# Altium PCB A313.2.PcbDoc (part 3 of 3)
Units mm, origin at the board's own origin, x right, y up, seen from the top; angles counter-clockwise.
Board outline 230.01 x 157.01 mm, 2 copper layers (Top Layer, Bottom Layer); 268 components, 266 nets, 1114 pads, 1214 vias.
Unrouted connection lines stored in the file: 2.
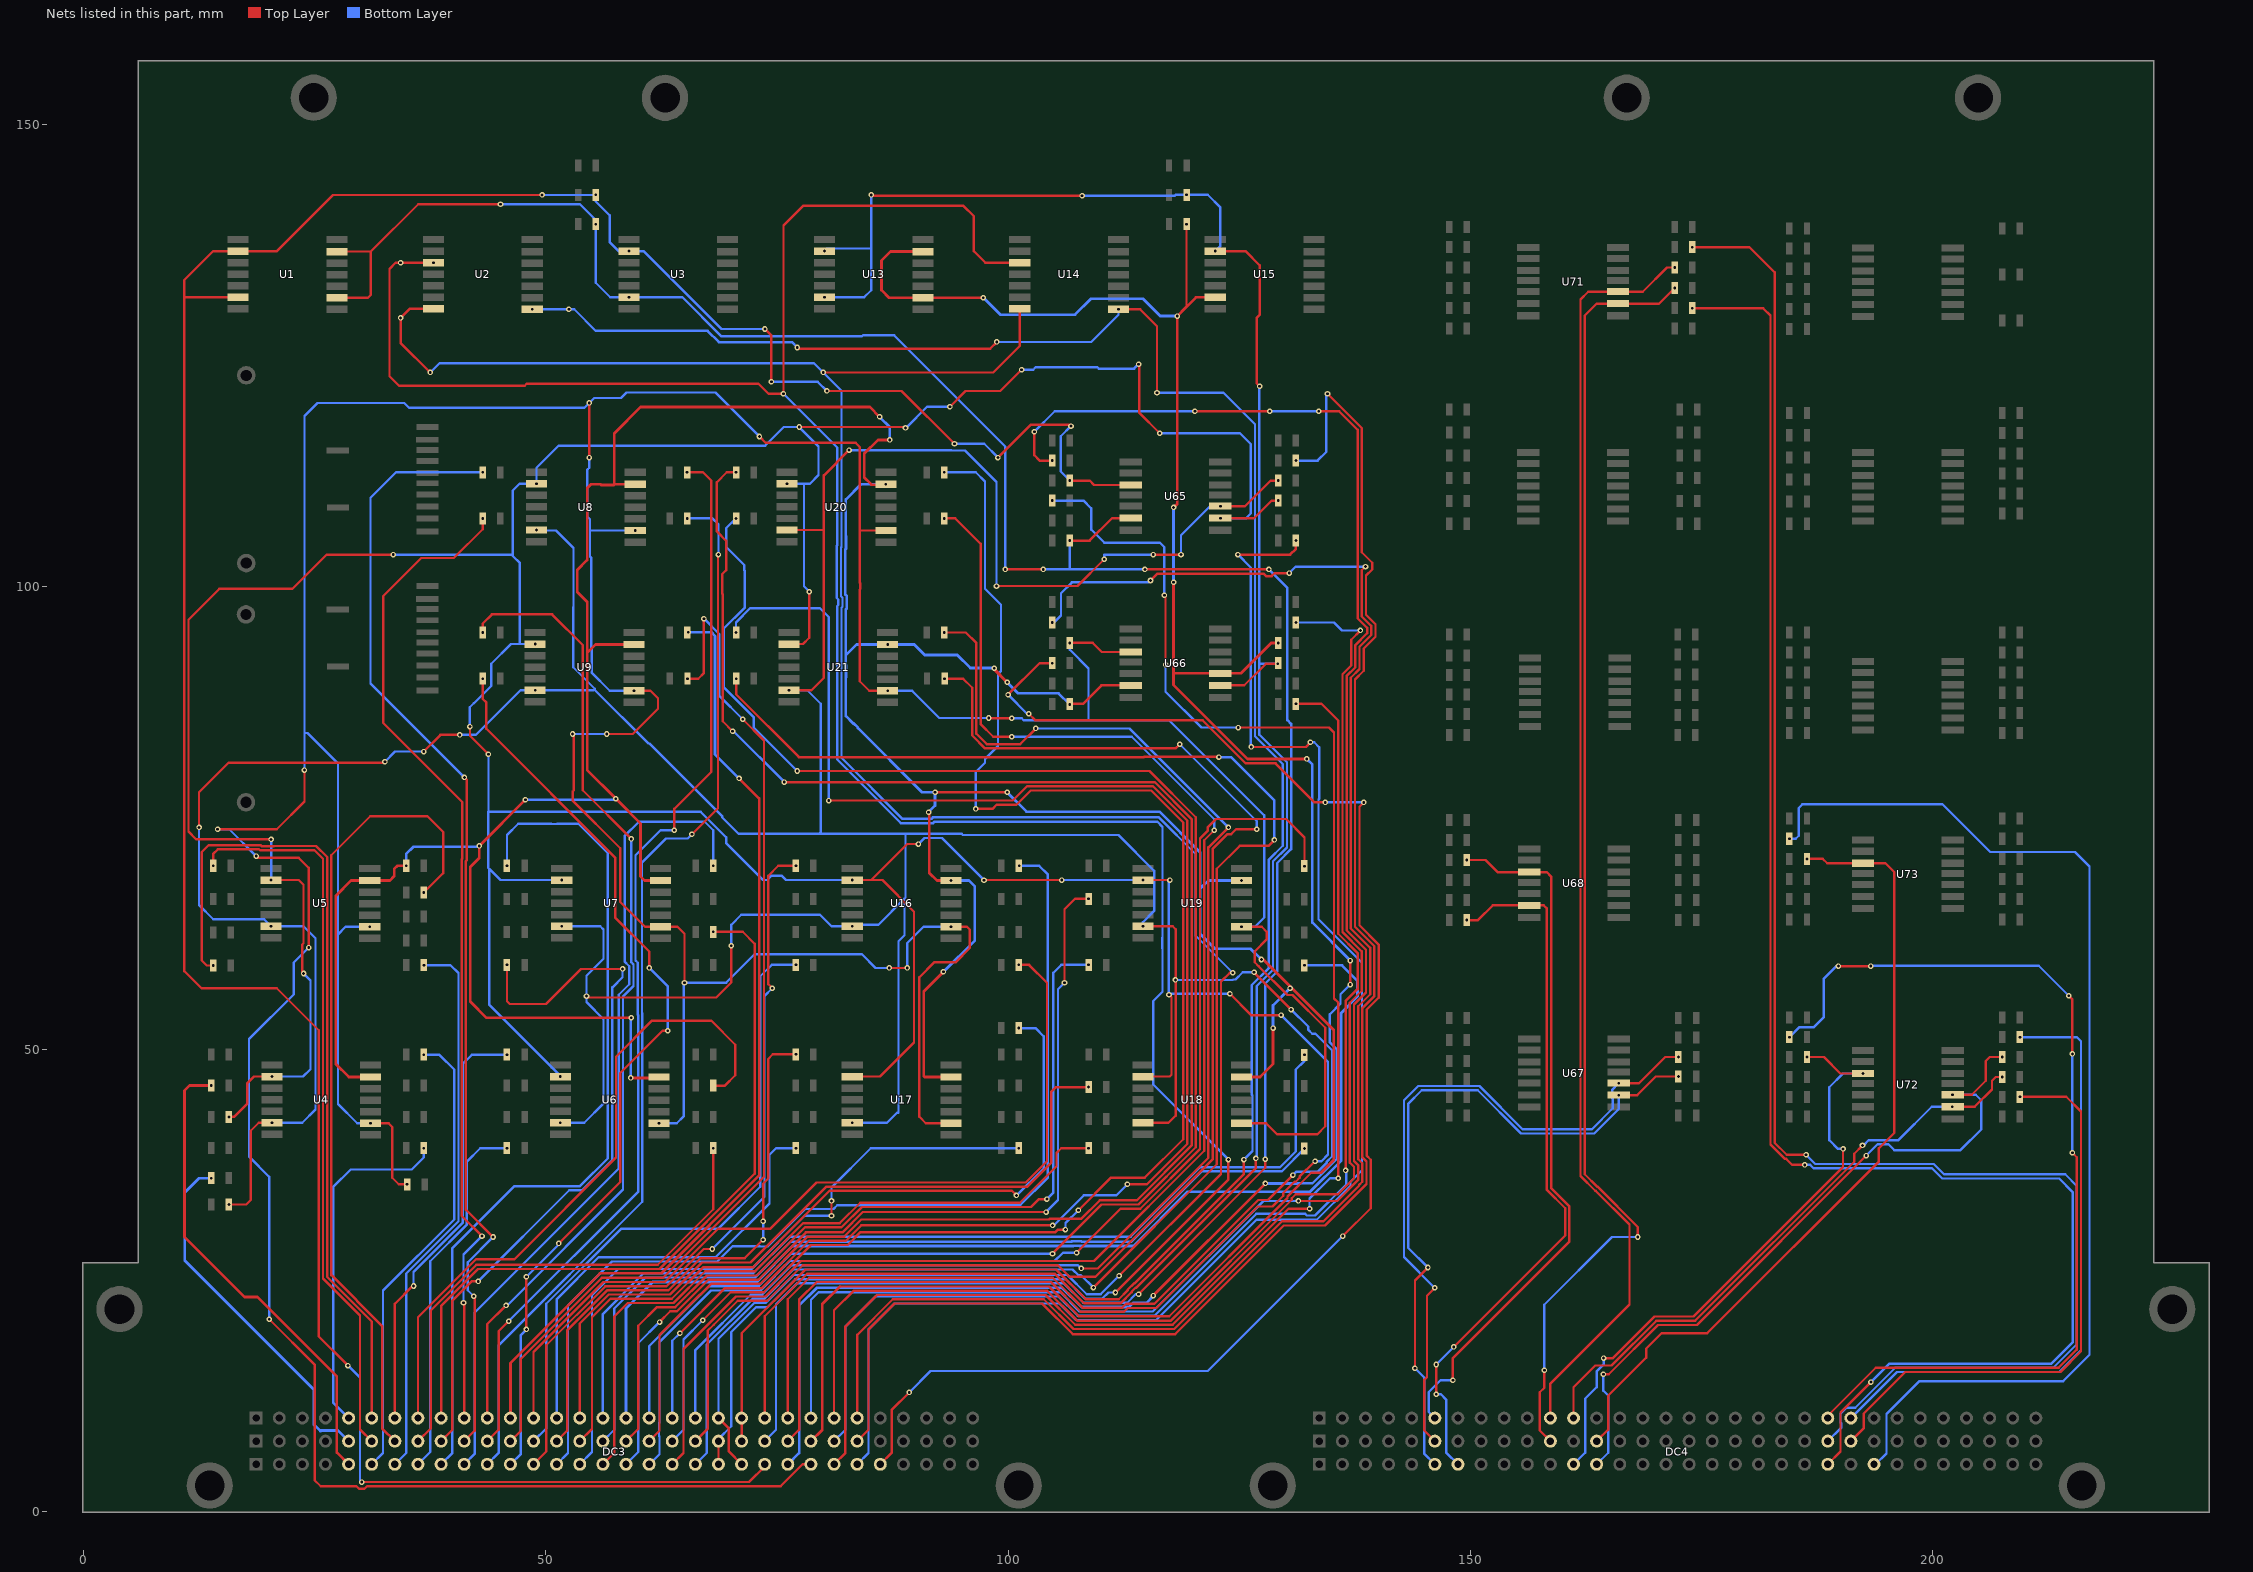
[diagram p3: the nets of this part, all layers, seen from the top]

## Via types
v1: diameter 0.6, hole 0.3, Top Layer to Bottom Layer, 1214 vias

## Nets (pads, with @x,y where several pads share a name; then routed paths per layer and width w, separated by ;. In a path a pad name is that pad's centre, name@x,y a point inside that pad or via, vN(x,y) a via of type N, cw(c..) or ccw(c..) an arc to the next point about the centre after c; other vN are vias at no path point) (continued)
"UPR D": DC4.B11 R169.2 U71.9 | length 141.6
  Top Layer w0.254: v1(158,15.3) 158,13.401 157.5,12.901 157.5,8.771 DC4.B11@158.65,7.621 ; v1(168.1,29.7) 168.1,30.78 163.729,35.151 163.691,35.151 162.354,36.488 162.354,129.354 163.634,130.634 U71.9@165.95,130.634 170.385,130.634 v1(172.099,132.347)
  Bottom Layer w0.254: v1(158,15.3) 157.973,15.327 157.973,22.373 165.3,29.7 v1(168.1,29.7)
"UPR D TTL": DC4.A23 R173.1 | length 183.9
  Top Layer w0.254: v1(173.999,130.15) 181.65,130.15 182.446,129.354 182.446,39.712 184.012,38.146 184.154,38.146 184.8,37.5 v1(186.15,37.5) ; DC4.A23@188.65,5.121 190.023,6.494 190.023,10.723 v1(193.308,14.008)
  Bottom Layer w0.254: v1(186.15,37.5) 186.758,37.5 187.112,37.146 199.912,37.146 201.034,36.024 213.676,36.024 215.129,34.571 215.129,18.288 212.849,16.008 195.308,16.008 v1(193.308,14.008)
"UPR F": DC4.A12 R179.2 U72.3 | length 67.9
  Top Layer w0.254: v1(164.4,16.6) 165.423,16.6 169.92,21.097 174.113,21.097 190.3,37.284 v1(190.3,39.227) ; v1(186.399,49.16) 188.228,49.16 190.003,47.385 v1(192.448,47.385)
  Bottom Layer w0.254: DC4.A12@161.15,5.121 162.4,6.371 162.4,12.201 163.65,13.451 163.65,15.162 164.4,15.912 v1(164.4,16.6) ; v1(190.3,39.227) 189.754,39.227 188.8,40.181 188.8,45.9 190.285,47.385 v1(192.448,47.385)
"UPR F TTL": DC4.C23 R183.1 | length 106
  Top Layer w0.254: DC4.C23@188.65,10.121 188.65,10.378 193.826,15.554 213.615,15.554 215.583,17.522 215.583,38.317 v1(215.1,38.8) ; v1(189.8,59) v1(193.3,59) ; v1(214.7,55.8) 215.1,55.4 v1(215.1,49.5)
  Bottom Layer w0.254: v1(184.499,51.308) 185.591,52.4 187.15,52.4 188.2,53.45 188.2,57.6 189.6,59 v1(189.8,59) ; v1(193.3,59) 193.346,59.046 211.454,59.046 v1(214.7,55.8) ; v1(215.1,38.8) v1(215.1,49.5)
"UPR KN1": DC4.A13 R182.2 U72.10 | length 77.6
  Top Layer w0.254: v1(164.377,14.861) 164.968,14.861 170.296,20.189 174.489,20.189 v1(192.8,38.5) ; v1(202.148,45.085) 204.223,45.085 205.738,46.6 205.738,48.738 206.16,49.16 v1(207.524,49.16)
  Bottom Layer w0.254: DC4.A13@163.65,5.121 164.9,6.371 164.9,12.542 164.377,13.065 v1(164.377,14.861) ; v1(192.8,38.5) 194.027,39.727 195.201,39.727 195.828,39.1 203,39.1 205.242,41.342 205.242,44.5 204.657,45.085 v1(202.148,45.085)
"UPR KN1 TTL": DC4.C24 R186.1 | length 68.1
  Bottom Layer w0.254: DC4.C24@191.15,10.121 196.129,15.1 213.681,15.1 216.037,17.456 216.037,50.863 215.592,51.308 v1(209.424,51.308)
"UPR KN2": DC4.C12 R181.2 U72.9 | length 64.7
  Top Layer w0.254: DC4.C12@161.15,10.121 161.15,13.45 163.5,15.8 165.265,15.8 170.108,20.643 174.301,20.643 191.5,37.842 191.5,38.7 v1(192.4,39.6) ; v1(202.1,43.786) U72.9@202.148,43.786 204.528,43.786 206.4,45.658 206.4,46.6 206.812,47.012 v1(207.524,47.012)
  Bottom Layer w0.254: v1(192.4,39.6) 192.5,39.6 193.081,40.181 196.281,40.181 199.886,43.786 v1(202.1,43.786)
"UPR KN2 TTL": DC4.B24 R185.1 | length 63
  Top Layer w0.254: DC4.B24@191.15,7.621 192.523,8.994 192.523,10.588 197.035,15.1 213.803,15.1 216.037,17.334 216.037,43.263 214.435,44.865 v1(209.424,44.865)
"UPR PP": DC4.C11 R170.2 U71.10 | length 138.4
  Top Layer w0.254: DC4.C11@158.65,10.121 158.65,13.85 167.2,22.4 167.2,31.038 163.541,34.697 163.503,34.697 161.9,36.3 161.9,131.1 162.733,131.933 U71.10@165.95,131.933 168.633,131.933 171.245,134.545 v1(172.099,134.545)
"UPR PP TTL": DC4.B23 R174.1 | length 188.2
  Top Layer w0.254: v1(173.999,136.743) 180.185,136.743 182.9,134.028 182.9,39.9 184.2,38.6 v1(186.3,38.6)
  Bottom Layer w0.254: v1(186.3,38.6) 187.3,37.6 200.1,37.6 201.222,36.478 214.322,36.478 215.583,35.217 215.583,18.1 213.037,15.554 195.941,15.554 191.626,11.239 191.617,11.248 190.683,11.248 190.023,10.588 190.023,9.654 190.089,9.589 190.089,9.06 DC4.B23@188.65,7.621
"UPR T1 TTL": DC3.C25 R95.1 | length 204.6
  Top Layer w0.254: v1(102.84,116.8) 102.84,114.24 103.411,113.669 v1(104.776,113.669) ; v1(120.2,119) v1(128.3,119) ; v1(131.4,33.6) 135.597,33.6 137.854,35.857 137.854,37.488 137.408,37.934 137.408,54.836 138.708,56.136 138.708,60.776 136.61,62.874 136.61,90.368 137.554,91.312 137.554,93.726 138.827,94.999 138.827,95.601 137.8,96.628 137.8,117 135.8,119 v1(133.6,119)
  Bottom Layer w0.254: DC3.C25@78.675,10.121 78.675,22.904 79.498,23.726 105.641,23.726 107.729,21.638 115.642,21.638 127.604,33.6 v1(131.4,33.6) ; v1(102.84,116.8) 105.04,119 v1(120.2,119) ; v1(128.3,119) v1(133.6,119)
"UPR T2 TTL": DC3.A26 R98.1 | length 178.3
  Top Layer w0.254: DC3.A26@81.175,5.121 82.4,6.346 82.4,20.017 85.805,23.422 104.047,23.422 107.266,20.203 117.788,20.203 130.338,32.753 v1(132.6,32.753) ; v1(116.9,99.1) 117.028,98.972 v1(117.028,91.6) ; v1(124.9,84.8) 134.7,84.8 135.248,84.252 135.248,55.507 135.7,55.055 v1(135.7,36.057)
  Bottom Layer w0.254: v1(104.776,109.344) 108.156,109.344 109,108.5 109,106.2 110.4,104.8 116.4,104.8 116.9,104.3 v1(116.9,99.1) ; v1(117.028,91.6) 117.028,88.672 120.9,84.8 v1(124.9,84.8) ; v1(132.6,32.753) 132.6,33.85 134.807,36.057 v1(135.7,36.057)
"UPR T3 TTL": DC3.B26 R113.1 | length 132.2
  Top Layer w0.254: v1(131.124,87.361) 133.893,87.361 135.702,85.552 135.702,62.498 137.8,60.4 137.8,56.512 136.5,55.212 v1(136.5,36.9)
  Bottom Layer w0.254: DC3.B26@81.175,7.621 82.4,8.846 82.4,20.017 85.655,23.272 105.453,23.272 107.541,21.184 115.83,21.184 126.846,32.2 132.125,32.2 132.299,32.026 133.2,32.026 136.574,35.4 136.574,36.826 v1(136.5,36.9)
"UPR T4 TTL": DC3.C26 R116.1 | length 145.5
  Top Layer w0.254: DC3.C26@81.175,10.121 81.175,21.775 83.276,23.876 104.235,23.876 107.454,20.657 117.6,20.657 130.673,33.73 130.673,33.901 131.099,34.327 135.682,34.327 137.4,36.045 137.4,37.3 136.954,37.746 136.954,55.024 138.254,56.324 138.254,60.588 136.156,62.686 136.156,90.556 137.1,91.5 137.1,94.3 v1(138.1,95.3)
  Bottom Layer w0.254: v1(131.124,96.152) 135.248,96.152 136.1,95.3 v1(138.1,95.3)
"UPR TE1 TTL": DC3.A27 R101.1 | length 161.7
  Top Layer w0.254: v1(124.85,103.5) 130.5,103.5 131.124,104.124 v1(131.124,105.018) ; v1(126.3,82.7) 132.2,82.7 v1(132.7,83.2)
  Bottom Layer w0.254: DC3.A27@83.675,5.121 84.9,6.346 84.9,19.696 87.718,22.514 105.569,22.514 107.353,20.73 116.018,20.73 126.86,31.572 133.388,31.572 137.028,35.212 137.028,35.673 138.277,36.922 138.277,59.351 137.514,60.114 133.573,64.055 133.573,77.001 133.65,77.078 133.65,82.65 133.1,83.2 v1(132.7,83.2) ; v1(124.85,103.5) 126.246,102.104 126.246,82.754 v1(126.3,82.7)
"UPR TE2 TTL": DC3.B27 R104.1 | length 176.4
  Top Layer w0.254: DC3.B27@83.675,7.621 84.9,8.846 84.9,19.696 87.718,22.514 103.671,22.514 106.985,19.2 118.069,19.2 129.814,30.945 134.287,30.945 138.762,35.42 138.762,37.864 138.316,38.31 138.316,54.46 139.616,55.76 139.616,61.152 137.518,63.25 137.518,89.992 138.462,90.936 138.462,93.35 139.735,94.623 139.735,95.977 138.708,97.004 138.708,101.23 139.377,101.899 139.377,102.623 138.254,103.746 138.254,117.188 v1(134.542,120.9)
  Bottom Layer w0.254: v1(131.124,113.669) 133.469,113.669 134.4,114.6 134.4,120.758 v1(134.542,120.9)
"UPR TE3 TTL": DC3.C27 R107.1 | length 180.8
  Top Layer w0.254: DC3.C27@83.675,10.121 83.675,19.113 87.53,22.968 103.859,22.968 107.078,19.749 117.976,19.749 129.626,31.399 134.099,31.399 137.95,35.25 137.95,35.311 138.308,35.669 138.308,37.676 137.862,38.122 137.862,54.648 139.162,55.948 139.162,60.964 137.064,63.062 137.064,90.18 138.008,91.124 138.008,93.538 139.281,94.811 139.281,95.789 138.254,96.816 138.254,101.804 v1(138.65,102.2) ; v1(115.4,100.7) 116.146,101.446 127.626,101.446 127.899,101.173 128.501,101.173 128.828,101.5 v1(130.4,101.5)
  Bottom Layer w0.254: v1(104.776,96.152) 104.976,96.152 105.726,96.902 105.726,99.326 106.9,100.5 115.2,100.5 v1(115.4,100.7) ; v1(130.4,101.5) 131.1,102.2 v1(138.65,102.2)
"UPR TE4 TTL": DC3.A28 R110.1 | length 162.4
  Top Layer w0.254: DC3.A28@86.175,5.121 87.4,6.346 87.4,10.996 v1(89.3,12.896) ; v1(100,88.356) 103.401,91.757 v1(104.776,91.757) ; v1(102.239,86.3) 102.966,85.573 121.046,85.573 125.696,80.923 128.928,80.923 133.151,76.7 v1(134.3,76.7) ; v1(136.2,29.8) 139.216,32.816 139.216,38.052 138.77,38.498 138.77,54.272 140.07,55.572 140.07,61.34 138,63.41 138,76.238 v1(138.462,76.7)
  Bottom Layer w0.254: v1(89.3,12.896) 91.604,15.2 121.6,15.2 v1(136.2,29.8) ; v1(100,88.356) 102.056,86.3 v1(102.239,86.3) ; v1(134.3,76.7) v1(138.462,76.7) v1@138.5,76.7
"UPR VIH": DC4.B13 R191.2 U73.3 | length 87.8
  Top Layer w0.254: DC4.B13@163.65,7.621 164.9,8.871 164.9,12.542 169,16.642 169,17.609 170.672,19.281 175.597,19.281 194.173,37.857 194.173,39.301 195.83,40.958 195.83,69.169 194.88,70.119 U73.3@192.448,70.119 188.581,70.119 188.107,70.593 v1(186.399,70.593)
"UPR VIH TTL": DC4.A25 R195.1 | length 122.1
  Bottom Layer w0.254: v1(184.499,72.771) 185.171,72.771 185.5,73.1 185.5,76.1 185.9,76.5 201.058,76.5 206.212,71.346 215.382,71.346 216.945,69.783 216.945,16.958 214.103,14.116 198.551,14.116 195,10.565 195,6.3 193.821,5.121 DC4.A25@193.65,5.121
"UPR. C1": DC4.A6 R127.2 U67.9 | length 76.5
  Top Layer w0.254: v1(144,15.5) 144,25 v1(145.4,26.4) ; v1(166.05,45.037) 168.028,45.037 170.048,47.056 v1(172.499,47.056)
  Bottom Layer w0.254: v1(144,15.5) 145.023,14.477 145.023,6.248 DC4.A6@146.15,5.121 ; v1(145.4,26.4) 143.262,28.538 143.262,44.1 144.734,45.572 150.786,45.572 155.458,40.9 163.4,40.9 166.05,43.55 v1(166.05,45.037)
"UPR. C2": DC4.B6 R130.2 U67.10 | length 76
  Top Layer w0.254: DC4.B6@146.15,7.621 145,8.771 145,14.25 145.3,14.55 145.3,23.35 v1(146.15,24.2) ; v1(166.05,46.336) 168.236,46.336 171.069,49.169 v1(172.499,49.169)
  Bottom Layer w0.254: v1(146.15,24.2) 142.808,27.542 142.808,44.482 144.352,46.026 150.974,46.026 155.646,41.354 163.131,41.354 165.4,43.623 165.4,44.659 165.323,44.736 165.323,45.609 v1(166.05,46.336)
"UPR. C3": DC4.C6 R131.2 U68.3 | length 76.6
  Top Layer w0.254: v1(148.1,14.2) 148.1,16.6 160.7,29.2 160.7,33.006 158.722,34.984 158.722,68.694 158.255,69.16 U68.3@156.35,69.16 152.94,69.16 151.626,70.474 v1(149.599,70.474)
  Bottom Layer w0.254: DC4.C6@146.15,10.121 145.5,10.771 145.5,12.928 146.772,14.2 v1(148.1,14.2)
"UPR. C4": DC4.A7 R132.2 U68.6 | length 77.4
  Top Layer w0.254: v1(146.3,12.7) v1(146.3,15.912) ; v1(148.2,17.812) 160.246,29.858 160.246,32.818 158.268,34.796 158.268,65.232 157.939,65.561 U68.6@156.35,65.561 152.412,65.561 150.822,63.971 v1(149.599,63.971)
  Bottom Layer w0.254: v1(146.3,12.7) 146.8,12.7 147.373,12.127 147.373,6.398 DC4.A7@148.65,5.121 ; v1(146.3,15.912) v1(148.2,17.812)
"UPR. T1": DC3.A23 R2.1 R97.2 U1.2 U1.6 U3.2 U65.3 | length 324.6
  Top Layer w0.254: U1.6@16.725,131.326 10.928,131.326 10.902,131.3 ; v1(28.6,15.8) 25.446,18.954 25.446,52.054 20.9,56.6 12.759,56.6 10.902,58.457 10.902,131.3 ; v1(30.1,3.2) 71.979,3.2 73.675,4.896 DC3.A23@73.675,5.121 ; v1(49.6,142.4) 27,142.4 20.926,136.326 U1.2@16.725,136.326 14.044,136.326 10.902,133.184 10.902,131.3 ; v1(73.7,127.9) 74.4,127.2 v1(74.4,122.2) ; v1(80.4,121.2) 88.482,121.2 v1(94.2,115.482) ; v1(98.9,114) 102.427,117.527 106.673,117.527 v1(106.8,117.4) ; v1(106.676,111.506) 108.83,111.506 109.301,111.036 U65.3@113.258,111.036
  Bottom Layer w0.254: v1(28.6,15.8) 29.9,14.5 29.9,3.4 v1(30.1,3.2) ; v1(49.6,142.4) 55.384,142.4 v1(55.4,142.416) 55.4,141.7 56.9,140.2 56.9,137.3 57.874,136.326 v1(58.995,136.326) 60.574,136.326 69,127.9 v1(73.7,127.9) ; v1(74.4,122.2) 79.4,122.2 v1(80.4,121.2) ; v1(94.2,115.482) 97.418,115.482 v1(98.9,114) ; v1(106.676,111.506) 105.7,112.482 105.7,116.3 v1(106.8,117.4)
"UPR. T2": DC3.B23 R3.1 R100.2 U1.9 U1.13 U3.6 U65.6 | length 293.3
  Top Layer w0.254: U1.9@27.4,131.276 30.776,131.276 31.076,131.576 31.076,136.276 ; U1.13@27.4,136.276 31.076,136.276 ; v1(45.1,141.4) 36.2,141.4 31.076,136.276 ; v1(99.7,101.9) v1(103.8,101.9) ; v1(106.676,105.018) 108.818,105.018 111.236,107.436 U65.6@113.258,107.436 ; v1(114.107,23.5) 127.8,37.193 v1(127.8,38.1) ; v1(114.8,101.9) v1(128.2,101.9)
  Bottom Layer w0.254: v1(45.1,141.4) 53.7,141.4 55.4,139.7 v1(55.4,139.232) 55.4,132.9 56.974,131.326 v1(58.995,131.326) 64.774,131.326 69,127.1 84.172,127.1 84.299,127.227 87.673,127.227 99.7,115.2 v1(99.7,101.9) ; DC3.B23@73.675,7.621 74.9,8.846 74.9,22.4 77.18,24.68 106.036,24.68 108.124,22.592 112.876,22.592 113.784,23.5 v1(114.107,23.5) ; v1(103.8,101.9) 106.7,101.9 ; v1(106.676,105.018) 106.676,101.924 106.7,101.9 ; v1(114.8,101.9) 106.7,101.9 ; v1(127.8,38.1) 127.8,57.116 129.108,58.424 129.108,70.148 130.608,71.648 130.608,85.192 130.2,85.6 130.2,99.9 v1(128.2,101.9)
"UPR. T3": DC3.C23 R49.1 R115.2 U13.2 U13.6 U15.2 U66.9 | length 253
  Top Layer w0.254: DC3.C23@73.675,10.121 73.675,21.139 78.274,25.738 105.006,25.738 108.225,22.519 112.161,22.519 113.38,23.738 113.38,23.801 113.806,24.227 113.869,24.227 126.8,37.158 v1(126.8,38.2) ; v1(85.2,142.4) 85.3,142.3 v1(108,142.3) ; v1(122.4,136.326) 125.674,136.326 127.2,134.8 127.2,129.428 126.873,129.101 126.873,122.027 v1(127.2,121.7) ; U66.9@122.958,89.364 125.538,89.364 127.875,91.701 v1(129.168,91.701) R115.2@129.224,91.757
  Bottom Layer w0.254: v1(80.13,131.326) 84.426,131.326 85.2,132.1 85.2,136.6 ; v1(80.13,136.326) 80.404,136.6 85.2,136.6 ; v1(85.2,142.4) 85.2,136.6 ; v1(108,142.3) 117.984,142.3 118.1,142.416 v1(119.3,142.416) 121.584,142.416 122.958,141.042 122.958,136.884 v1(122.4,136.326) ; v1(126.8,38.2) 126.885,38.285 126.885,56.843 128.654,58.612 128.654,70.336 130.154,71.836 130.154,81.034 127.154,84.034 127.154,91.7 ; v1(127.2,121.7) 127.154,121.654 127.154,91.7 ; v1(129.168,91.701) 127.155,91.701 127.154,91.7
"UPR. T4": DC3.A24 R50.1 R118.2 U13.9 U13.13 U15.6 U66.10 | length 257.6
  Top Layer w0.254: 119.2,130.2 119.3,130.3 v1(119.3,139.232)
  Top Layer w0.3: U13.13@90.805,136.276 87.276,136.276 86.3,135.3 86.3,132.1 87.124,131.276 U13.9@90.805,131.276 v1(97.318,131.276) ; v1(115.7,23.37) v1(127.83,35.5) ; v1(117.9,100.5) 117.9,90.7 ; v1(117.9,108.598) 118.3,108.998 v1(118.3,129.3) 119.2,130.2 ; 119.3,130.3 120.326,131.326 U15.6@122.4,131.326 ; v1(129.224,93.954) 128.454,93.954 125.164,90.664 U66.10@122.958,90.664 117.936,90.664 117.9,90.7 ; v1(132.3,81.4) 125.894,81.4 117.9,89.394 117.9,90.7 ; v1(137,57) v1(137,59.6)
  Bottom Layer w0.254: 131.6,35.5 132.9,35.5 135.508,38.108 135.508,50.042 134.8,50.75 134.8,53.8 135.95,54.95 135.95,55.95 v1(137,57)
  Bottom Layer w0.3: DC3.A24@76.175,5.121 77.4,6.346 77.4,22.303 79.3,24.203 105.838,24.203 107.926,22.115 113.074,22.115 113.559,22.6 115,22.6 115.7,23.3 v1(115.7,23.37) ; v1(97.318,131.276) 99.145,129.45 107.25,129.45 108.977,131.177 114.575,131.177 116.452,129.3 v1(118.3,129.3) ; v1(117.9,100.5) v1(117.9,108.598) ; v1(127.83,35.5) 131.6,35.5 ; v1(132.3,81.4) 132.9,80.8 132.9,63.7 v1(137,59.6)
"UPR. TK1": DC3.B24 R4.1 R103.2 U4.2 U5.2 U6.2 U7.2 U8.2 U9.2 U16.2 U17.2 U18.2 U19.2 U20.2 U21.2 U65.9 | length 579.1
  Top Layer w0.254: v1(15.724,42.69) 16.29,42.69 17.7,44.1 17.7,46.3 18.451,47.051 v1(20.375,47.051) ; v1(20.292,68.303) 23.291,68.303 23.8,67.793 23.8,61.459 23.643,61.303 23.643,58.357 v1(23.8,58.2) ; v1(20.292,72.7) 12.2,72.7 11.356,73.544 11.356,96.456 14.7,99.8 22.6,99.8 26.3,103.5 v1(33.5,103.5) ; v1(41.8,84.9) 41.8,83.9 v1(43.8,81.9) ; DC3.B24@76.175,7.621 77.4,8.846 77.4,22.934 79.296,24.83 104.63,24.83 107.849,21.611 112.537,21.611 112.945,22.019 116.023,22.019 127.004,33 128.6,33 129.765,34.165 129.765,34.465 130.973,35.673 131.101,35.673 131.527,36.099 131.527,36.227 v1(133.2,37.9) ; U21.2@76.3,93.826 77.825,93.826 78.5,94.501 v1(78.5,99.477) ; v1(77.4,117.3) 77.409,117.309 88.791,117.309 v1(88.9,117.2) ; U17.2@83.147,47.051 86.151,47.051 89.827,50.727 89.827,64.878 86.403,68.303 85.189,68.303 ; v1(83.147,68.303) 85.189,68.303 ; v1(90.3,72.2) 89.086,72.2 85.189,68.303 ; v1(93.7,119.5) 95.4,121.2 99.151,121.2 v1(101.451,123.5) ; v1(97.393,68.293) 97.393,68.307 v1(105.8,68.307) ; v1(114.107,124.1) 114.2,124.007 114.2,118.832 v1(116.4,116.632) ; U18.2@114.575,47.051 117.478,47.051 117.673,47.246 117.673,55.627 v1(117.4,55.9) v1@117.373,55.927 ; v1(114.575,68.303) v1(117.495,68.303) ; v1(122.958,107.436) 126.6,107.436 128.508,109.344 v1(129.224,109.344) ; v1(123.982,56) 126.282,53.7 v1(129.524,53.7)
  Bottom Layer w0.254: v1(20.292,68.303) v1(20.292,72.7) ; v1(20.375,47.051) 23.751,47.051 24.546,47.846 24.546,57.454 v1(23.8,58.2) ; v1(33.5,103.5) 33.505,103.495 46.295,103.495 46.427,103.363 ; v1(41.8,84.9) 41.774,84.926 41.774,87.001 42.2,87.427 42.227,87.427 44.1,89.3 44.1,91.7 46.226,93.826 47.2,93.826 ; v1(43.8,81.9) 43.8,75.7 ; v1(48.85,93.826) 47.2,93.826 ; v1(51.575,47.051) 51.575,47.125 43.902,54.798 43.902,69.498 ; v1(51.719,68.303) 45.097,68.303 43.902,69.498 ; v1(76.1,111.158) 77.919,111.158 ; v1(78.5,99.477) 78.5,99.502 77.919,100.083 77.919,111.158 ; v1(83.147,68.303) 75.982,68.303 75.503,68.781 74.419,68.781 73.94,68.303 73.497,68.303 69.5,72.3 69.5,72.942 66.742,75.7 43.8,75.7 ; v1(88.9,117.2) 88.942,117.2 91.242,119.5 v1(93.7,119.5) ; v1(90.3,72.2) 90.946,72.846 92.841,72.846 v1(97.393,68.293) ; v1(101.451,123.5) 102.709,123.5 102.978,123.769 109.661,123.769 109.811,123.619 113.626,123.619 v1(114.107,124.1) ; v1(105.8,68.307) 105.804,68.303 v1(114.575,68.303) ; v1(116.4,116.632) 125.068,116.632 126.246,115.454 126.246,107.946 125.736,107.436 v1(122.958,107.436) ; v1(117.495,68.303) 117.373,68.181 117.373,55.927 v1(117.4,55.9) 117.5,56 v1(123.982,56) ; v1(129.524,53.7) 134.6,48.624 134.6,38.617 133.883,37.9 v1(133.2,37.9) ; 43.8,75.7 43.773,75.673 43.773,69.627 43.902,69.498 ; 46.427,103.363 46.427,110.427 47.158,111.158 v1(49,111.158) 49,112.9 51.381,115.281 73.719,115.281 75.738,117.3 v1(77.4,117.3) 79.5,115.2 79.5,112.1 78.558,111.158 77.919,111.158 ; 46.427,103.363 47.2,102.59 47.2,93.826
"UPR. TK2": DC3.C24 R5.1 R106.2 U4.6 U5.6 U6.6 U7.6 U8.6 U9.6 U16.6 U17.6 U18.6 U19.6 U20.6 U21.6 U65.10 | length 575.1
  Top Layer w0.254: v1(12.5,74) 12.5,77.8 15.7,81 32.5,81 v1(32.6,81.1) ; v1(15.724,33.207) 17.6,33.207 18.1,33.707 18.1,41.2 18.951,42.051 v1(20.375,42.051) ; v1(36.8,82.2) 38.6,84 v1(40.7,84) ; v1(54.4,55.754) 54.554,55.6 64,55.6 68.425,55.6 70.054,57.229 v1(70.054,61.2) ; U20.6@76.1,106.158 80.031,106.158 80.073,106.2 ; DC3.C24@76.175,10.121 76.175,22.975 78.484,25.284 104.818,25.284 108.037,22.065 112.349,22.065 112.757,22.473 115.835,22.473 127.062,33.7 128.1,33.7 v1(130.8,36.4) ; v1(76.3,88.826) 78.726,88.826 80.073,90.173 80.073,106.2 ; v1(82.8,114.8) 80.073,112.073 80.073,106.2 ; v1(98.746,100.093) 98.753,100.1 107.5,100.1 v1(110.4,103) ; U18.6@114.575,42.051 117.351,42.051 118.127,42.827 118.127,57.473 v1(118.1,57.5) 118.127,57.527 118.127,62.973 117.797,63.303 v1(114.575,63.303) ; v1(115.7,103.5) v1(118.7,103.5) ; v1(122.958,108.736) 125.623,108.736 128.393,111.506 v1(129.224,111.506) ; v1(126.6,58.332) 126.6,58.308 v1(130.608,54.3)
  Bottom Layer w0.254: v1(12.5,74) 12.5,65.6 14.04,64.06 19.534,64.06 v1(20.292,63.303) 20.294,63.3 23.8,63.3 25.097,62.003 25.097,43.497 23.651,42.051 v1(20.375,42.051) ; v1(32.6,81.1) 33.7,82.2 v1(36.8,82.2) ; v1(40.7,84) 42.431,84 47.257,88.826 v1(48.85,88.826) 55.126,88.826 55.3,89 ; v1(49,106.158) 49.05,106.108 51.092,106.108 53,104.2 53,97.817 52.973,97.79 52.973,91.327 55.3,89 ; v1(51.575,42.051) 54.151,42.051 56.246,44.146 56.246,53.254 54.4,55.1 v1(54.4,55.754) 54.4,57.946 56.246,59.792 56.246,62.954 55.897,63.303 v1(51.719,63.303) ; v1(70.054,61.2) 70.054,63.459 71.147,64.553 79.647,64.553 80.897,63.303 v1(83.147,63.303) 83.299,63.455 85.955,63.455 88.8,66.3 ; v1(76.3,88.826) 78.274,88.826 79.727,87.373 79.727,73.527 79.5,73.3 ; v1(82.8,114.8) 93.854,114.8 93.899,114.755 95.345,114.755 98.746,111.354 v1(98.746,100.093) ; v1(83.147,42.051) 86.9,42.051 88,43.151 ; 88.149,43.151 88.149,61.687 88.8,62.338 88.8,66.3 ; v1(110.4,103) 110.4,103.5 v1(115.7,103.5) ; v1(114.575,63.303) 114.575,63.744 115.792,64.961 115.792,69.315 111.934,73.173 95.099,73.173 94.972,73.3 88.9,73.3 ; v1(118.1,57.5) 124.3,57.5 124.355,57.555 124.601,57.555 125.378,58.332 v1(126.6,58.332) ; v1(118.7,103.5) 118.7,105.6 121.836,108.736 v1(122.958,108.736) ; v1(130.608,54.3) 132.473,52.435 132.473,52.099 132.899,51.673 133.235,51.673 135.054,49.854 135.054,38.429 134.447,37.822 134.447,37.697 133.523,36.773 131.173,36.773 v1(130.8,36.4) ; 55.3,89 55.3,88.872 61.099,83.073 61.227,83.073 69.073,75.227 69.073,75.099 70.872,73.3 79.5,73.3 ; 79.5,73.3 88.9,73.3 ; 88.8,66.3 88.9,66.4 88.9,73.3
"UPR. TK3": DC3.A25 R6.1 R109.2 U4.9 U5.9 U6.9 U7.9 U8.9 U9.9 U16.9 U17.9 U18.9 U19.9 U20.9 U21.9 U66.3 | length 630.4
  Top Layer w0.254: v1(14.5,73.8) 20.9,73.8 23.9,76.8 v1(23.9,80.2) ; v1(18.675,70.9) 18.675,70.87 18.845,70.7 23.288,70.7 24.37,69.618 v1(24.37,61.001) ; v1(20.1,20.8) 25,15.9 25,3.4 25.654,2.746 29.526,2.746 29.799,2.473 30.401,2.473 30.674,2.746 75.394,2.746 77.769,5.121 DC3.A25@78.675,5.121 ; v1(31.05,42.001) 32.999,42.001 33.4,41.6 33.4,36.1 34.1,35.4 v1(35,35.4) ; v1(52.9,84.1) 53.027,83.973 53.027,77.999 52.9,77.872 52.9,76.9 58.051,71.749 58.051,65.924 60.722,63.253 U7.9@62.394,63.253 64.247,63.253 65,62.5 v1(65,57.2) ; v1(54.7,114) v1(54.7,119.9) ; v1(56.6,84.1) 59.405,84.1 62.127,86.822 62.127,87.973 61.324,88.776 v1(59.525,88.776) ; v1(73.1,116.274) 73.791,115.583 83.517,115.583 83.955,115.145 83.955,106.1 ; U20.9@86.775,106.108 83.963,106.108 83.955,106.1 ; v1(86.975,88.776) 84.979,88.776 83.955,89.8 83.955,99.727 84.027,99.799 84.027,100.401 83.955,100.473 83.955,106.1 ; v1(87.143,58.8) v1(89.1,58.8) ; U17.9@93.822,42.001 91.099,42.001 90.4,42.7 90.4,57.8 92,59.4 94.3,59.4 95.85,60.95 95.85,62.95 95.547,63.253 v1(93.822,63.253) ; v1(97.9,85.829) 97.929,85.8 v1(100.4,85.8) ; v1(106.676,93.954) 109.146,93.954 110.136,92.964 U66.3@113.258,92.964 ; U18.9@125.25,42.001 127.899,42.001 129.099,40.801 133.43,40.801 134.3,41.671 134.3,52.328 130.755,55.873 130.199,55.873 127.09,58.982 126.664,59.408 126.664,60.588 127.955,61.88 127.955,62.718 127.42,63.253 v1(125.25,63.253)
  Bottom Layer w0.254: v1(14.5,73.8) 15.775,73.8 v1(18.675,70.9) ; v1(20.1,20.8) 20.1,36.2 17.9,38.4 17.9,51.1 22.742,55.942 22.742,59.373 v1(24.37,61.001) ; v1(23.9,80.2) 23.9,84.2 ; v1(30.967,63.253) 28.353,63.253 27.522,62.422 ; v1(31.05,42.001) 29.599,42.001 27.522,44.078 27.522,62.422 ; v1(52.9,84.1) v1(56.6,84.1) ; v1(54.7,114) 54.7,112.9 54.5,112.7 54.5,107.6 54.773,107.327 54.773,106.108 ; v1(59.525,88.776) 56.924,88.776 54.954,90.746 54.954,93.338 54.923,93.369 54.923,103.149 54.773,103.299 54.773,106.108 ; v1(59.675,106.108) 54.773,106.108 ; v1(62.25,42.001) 64.157,42.001 64.901,42.746 64.901,55.273 64.927,55.299 64.927,55.901 64.901,55.927 64.901,57.101 v1(65,57.2) 69.5,57.2 72.573,60.273 84.182,60.273 85.655,58.8 v1(87.143,58.8) ; v1(73.1,116.274) 68.347,121.027 58.727,121.027 58.135,120.435 55.235,120.435 v1(54.7,119.9) 54.181,119.381 35.219,119.381 34.7,119.9 25.3,119.9 23.9,118.5 23.9,84.2 ; v1(86.975,88.776) 89.614,88.776 92.561,85.829 v1(97.9,85.829) ; v1(89.1,58.8) 89.1,61.5 90.853,63.253 v1(93.822,63.253) ; v1(100.4,85.8) 101.473,85.8 101.7,85.573 108.8,85.573 ; v1(106.676,93.954) 106.676,93.224 108.7,91.2 108.7,85.673 108.8,85.573 ; v1(125.25,63.253) 126.692,63.253 127.7,64.261 127.7,75.3 117.427,85.573 108.8,85.573 ; 23.9,84.2 24.244,84.2 27.522,80.922 27.522,62.422
"UPR. TK4": DC3.B25 R7.1 R112.2 U4.13 U5.13 U6.13 U7.13 U8.13 U9.13 U16.13 U17.13 U18.13 U19.13 U20.13 U21.13 U66.6 | length 496.8
  Top Layer w0.254: 81.819,24.353 104.432,24.353 107.651,21.134 117.435,21.134 130.219,33.918 130.219,34.089 132.781,36.651 132.952,36.651
  Top Layer w0.3: U4.13@31.05,47.001 28.699,47.001 27.285,48.415 27.285,66.589 28.948,68.253 U5.13@30.967,68.253 33.137,68.253 33.6,68.716 33.6,69.5 33.95,69.85 v1(34.902,69.85) ; v1(47.801,77) v1(42.801,72) 42.801,70.67 41.831,69.7 41.831,55.169 43.6,53.4 v1(59.254,53.4) ; v1(59.2,46.9) 62.149,46.9 U6.13@62.25,47.001 ; U9.13@59.525,93.776 55.376,93.776 54.477,92.877 ; U8.13@59.675,111.108 57.45,111.108 ; U7.13@62.394,68.253 60.695,68.253 60.247,68.7 60.247,74.424 v1(57.572,77.1) 54.477,80.195 54.477,92.877 ; DC3.B25@78.675,7.621 79.9,8.846 79.9,22.434 81.819,24.353 ; v1(86.1,118.4) 85.05,119.45 60.25,119.45 57.4,116.6 57.4,111.158 57.45,111.108 ; v1(86.775,111.108) 86.735,111.068 85.232,111.068 84.432,111.868 84.432,114.414 85.918,115.9 v1(87.2,115.9) ; v1(91.4,75.647) 91.473,75.573 91.473,69.081 92.301,68.253 v1(93.822,68.253) ; v1(92.1,77.8) v1(99.9,77.8) ; v1(93,58.382) 90.877,56.259 90.877,47.108 90.984,47.001 U17.13@93.822,47.001 ; v1(98.5,91.2) 98.5,91.1 v1(99.9,89.7) ; v1(106.676,87.292) R112.2@106.676,87.361 108.099,87.361 110.102,89.364 U66.6@113.258,89.364 ; U18.13@125.25,47.001 127.259,47.001 128.654,48.396 v1(128.654,52.3) ; v1(127.391,59.709) 127.593,59.709 135.223,52.08 135.223,38.024 133.85,36.651 132.952,36.651 ; 54.477,92.877 54.477,98.4 53.4,99.477 53.4,101.823 54.477,102.9 54.477,110.677 54.908,111.108 55.902,111.108 55.989,111.021 57.363,111.021 57.45,111.108
  Bottom Layer w0.3: v1(34.902,69.85) 34.902,71.102 35.7,71.9 42.701,71.9 v1(42.801,72) ; v1(47.801,77) 57.472,77 v1(57.572,77.1) ; v1(59.2,46.9) 59.2,53.346 v1(59.254,53.4) ; 82.477,92.641 83.613,93.776 v1(86.975,93.776) 89.85,93.776 90.986,92.641 94.504,92.641 95.914,91.231 98.469,91.231 v1(98.5,91.2) ; v1(86.1,118.4) 87.2,117.3 v1(87.2,115.9) ; v1(86.775,111.108) 84.095,111.108 82.45,109.463 82.45,105.511 82.458,105.503 82.458,104.13 82.397,104.069 82.397,99.198 82.558,99.037 82.558,97.663 82.45,97.555 82.45,91.589 82.477,91.562 82.477,90.231 82.45,90.204 82.45,86.05 83.25,85.25 83.311,85.25 83.75,84.811 83.75,84.75 90.7,77.8 v1(92.1,77.8) 92.1,76.347 v1(91.4,75.647) ; v1(93,58.382) 96.4,61.782 96.4,67.615 95.763,68.253 v1(93.822,68.253) ; v1(99.9,77.8) 102,75.7 116.375,75.7 120.777,71.298 120.777,67.377 ; v1(99.9,89.7) 101.1,88.5 105.469,88.5 v1(106.676,87.292) ; v1(125.25,68.253) 121.653,68.253 120.777,67.377 ; v1(127.391,59.709) 126.228,60.872 122.385,60.872 120.777,62.48 120.777,67.377 ; v1(128.654,52.3) 128.654,54.754 v1(130.5,56.6)
"VHOD 1A": DC3.A5 R16.2 | length 51.7
  Top Layer w0.3: v1(13.824,46.074) 11.474,46.074 10.925,45.525 10.925,29.7 17.425,23.2 18.8,23.2 27.4,14.6 27.4,6.396 DC3.A5@28.675,5.121
"VHOD 1B": DC3.B6 R32.2 | length 78.9
  Top Layer w0.254: v1(14.024,69.85) 14.024,71.114 14.537,71.627 18.976,71.627 19.084,71.519 20.781,71.519 20.788,71.526 24.974,71.526 25.9,70.6 25.9,25.2 29.9,21.2 29.9,8.896 DC3.B6@31.175,7.621
"VHOD 2A": DC3.B5 R18.2 | length 39
  Bottom Layer w0.3: v1(13.824,36.057) 12.507,36.057 10.95,34.5 10.95,27.15 24.9,13.2 24.9,9.427 25.627,8.7 25.699,8.771 27.525,8.771 DC3.B5@28.675,7.621
"VHOD 2B": DC3.C6 R34.2 | length 90.3
  Top Layer w0.254: v1(14.024,59.059) 13.341,59.059 12.8,59.6 12.8,71.342 13.539,72.081 19.164,72.081 19.272,71.973 20.593,71.973 20.6,71.98 25.162,71.98 26.354,70.788 26.354,25.388 31.175,20.567 DC3.C6@31.175,10.121
"VHOD 3A": DC3.C5 R20.2 | length 37.8
  Bottom Layer w0.254: DC3.C5@28.675,10.121 27.002,11.794 27.002,35.102 28.9,37 35.5,37 36.802,38.302 v1(36.802,39.307)
"VHOD 3B": DC3.A7 R36.2 | length 60.1
  Top Layer w0.254: R36.2@36.802,59.132 v1(36.834,59.1)
  Bottom Layer w0.254: DC3.A7@33.675,5.121 34.9,6.346 34.9,25.758 40.554,31.412 40.554,58.246 39.7,59.1 v1(36.834,59.1)
"VHOD 4A": DC3.A6 R22.2 | length 50.3
  Bottom Layer w0.254: DC3.A6@31.175,5.121 32.4,6.346 32.4,23.9 40.1,31.6 40.1,47.8 38.5,49.4 v1(36.802,49.4)
"VHOD 4B": DC3.B7 R38.2 | length 88.2
  Top Layer w0.254: DC3.B7@33.675,7.621 32.302,8.994 32.302,20.082 26.808,25.576 26.808,70.976 26.8,70.984 31.016,75.2 37.2,75.2 38.9,73.5 38.9,69.052 v1(36.802,66.954)
"VHOD 5A": DC3.C7 R24.2 | length 46.6
  Top Layer w0.254: DC3.C7@33.675,10.121 33.675,22.475 35.6,24.4 v1(35.7,24.4)
  Bottom Layer w0.254: v1(35.7,24.4) 35.7,25.916 41.008,31.224 41.008,48.408 42,49.4 v1(45.8,49.4)
"VHOD 5B": DC3.A9 R40.2 | length 93.8
  Bottom Layer w0.254: DC3.A9@38.675,5.121 39.9,6.346 39.9,28.5 46.6,35.2 53.7,35.2 56.7,38.2 56.7,71.2 53.5,74.4 51.228,74.4 51.201,74.373 50.599,74.373 50.572,74.4 47.025,74.4 45.8,73.175 v1(45.8,69.85)
"VHOD 6A": DC3.A8 R26.2 | length 39.9
  Bottom Layer w0.254: DC3.A8@36.175,5.121 37.5,6.446 37.5,27.074 41.462,31.036 41.462,37.862 42.907,39.307 v1(45.8,39.307)
"VHOD 6B": DC3.B9 R42.2 | length 78.5
  Top Layer w0.254: DC3.B9@38.675,7.621 39.9,8.846 39.9,22.82 41.98,24.9 v1(42.684,24.9) ; v1(45.8,59.132) 45.8,55.2 46.1,54.9 50.022,54.9 53.811,58.689 v1(58.3,58.689)
  Bottom Layer w0.254: v1(42.684,24.9) 52.53,34.746 53.888,34.746 57.2,38.058 57.2,56.7 58.3,57.8 v1(58.3,58.689)
"VHOD 7A": DC3.B8 R28.2 | length 56.4
  Top Layer w0.254: DC3.B8@36.175,7.621 37.548,8.994 37.548,21.752 42.496,26.7 62.1,26.7 68.101,32.701 v1(68.101,39.307)
"VHOD 7B": DC3.C9 R44.2 | length 81.9
  Top Layer w0.254: DC3.C9@38.675,10.121 38.675,22.237 42.684,26.246 62.288,26.246 72.6,36.558 72.6,61.4 71.295,62.705 v1(68.101,62.705)
"VHOD 8A": DC3.C8 R30.2 | length 72.1
  Top Layer w0.254: DC3.C8@36.175,10.121 36.175,21.021 42.454,27.3 46.6,27.3 57.6,38.3 57.6,49.2 61.5,53.1 67.9,53.1 70.5,50.5 70.5,47.2 69.374,46.074 R30.2@68.101,46.074
"VHOD 8B": DC3.A10 R46.2 | length 90
  Bottom Layer w0.254: DC3.A10@41.175,5.121 42.302,6.248 42.302,8.09 42.3,8.092 42.3,9.652 42.302,9.654 42.302,21.502 57.9,37.1 57.9,55.9 59.027,57.027 59.027,58.99 58.527,59.49 58.527,73.055 60.072,74.6 67.2,74.6 68.101,73.699 v1(68.101,69.85)
"VHOD 9A": DC3.A13 R63.2 | length 82.4
  Top Layer w0.254: DC3.A13@48.675,5.121 50.048,6.494 50.048,17.989 56.443,24.384 63.059,24.384 67.075,28.4 v1(68,28.4) ; v1(74.5,56.6) 74.054,57.046 74.054,68.754 75.15,69.85 v1(77.049,69.85)
  Bottom Layer w0.254: v1(68,28.4) 73.654,34.054 73.654,55.754 v1(74.5,56.6)
"VHOD 9B": DC3.B14 R79.2 | length 60.7
  Top Layer w0.254: DC3.B14@51.175,7.621 52.302,8.748 52.302,19.601 56.631,23.93 63.247,23.93 66.717,27.4 71.5,27.4 v1(73.5,29.4) ; v1(73.5,31.4) 73.5,35.467 74.054,36.021 74.054,48.958 74.553,49.457 v1(77.049,49.457)
  Bottom Layer w0.254: v1(73.5,29.4) v1(73.5,31.4)
"VHOD 10A": DC3.B13 R65.2 | length 70.9
  Bottom Layer w0.254: DC3.B13@48.675,7.621 50.048,8.994 50.048,22.48 58.18,30.611 68.677,30.611 73.2,35.135 73.2,57.9 74.432,59.132 v1(77.049,59.132)
"VHOD 10B": DC3.C14 R81.2 | length 48.6
  Bottom Layer w0.254: DC3.C14@51.175,10.121 51.175,22.923 51.154,22.944 55.71,27.5 68.362,27.5 74.2,33.338 74.2,38.6 74.907,39.307 v1(77.049,39.307)
"VHOD 11A": DC3.C13 R67.2 | length 94.4
  Top Layer w0.254: DC3.C13@48.675,10.121 48.675,17.258 56.255,24.838 62.871,24.838 68.645,30.611 74.3,30.611 79.289,35.6 101.9,35.6 104.2,37.9 104.2,57.2 102.268,59.132 v1(101.15,59.132)
"VHOD 11B": DC3.A15 R83.2 | length 73.4
  Top Layer w0.254: v1(80.9,32) v1(80.9,33.6)
  Bottom Layer w0.254: DC3.A15@53.675,5.121 55,6.446 55,23.4 57.833,26.233 72.247,26.233 78.014,32 v1(80.9,32) ; v1(80.9,33.6) 80.9,35.057 85.15,39.307 v1(101.15,39.307)
"VHOD 12A": DC3.A14 R69.2 | length 111.7
  Top Layer w0.254: R69.2@101.15,69.8 v1(101.2,69.85)
  Bottom Layer w0.254: DC3.A14@51.175,5.121 52.4,6.346 52.4,22.3 57.146,27.046 68.55,27.046 70.204,28.7 73.172,28.7 73.199,28.673 74,28.673 78.054,32.727 81.127,32.727 81.524,33.124 101.3,33.124 104.3,36.124 104.3,68.9 103.35,69.85 v1(101.2,69.85)
"VHOD 12B": DC3.B15 R218.2 | length 87.2
  Top Layer w0.254: DC3.B15@53.675,7.621 55,8.946 55,21.015 57.007,23.022 63.623,23.022 67.047,26.446 72.446,26.446 80.692,34.692 100.408,34.692 v1(100.9,34.2)
  Bottom Layer w0.254: v1(100.9,34.2) 103.846,37.146 103.846,48.054 103.846,51.394 102.947,52.293 v1(101.15,52.293)
"VHOD 13A": DC3.C15 R71.2 | length 80.3
  Top Layer w0.254: DC3.C15@53.675,10.121 53.675,20.332 56.819,23.476 63.435,23.476 66.905,26.946 72.153,26.946 80.353,35.146 102.088,35.146 104.654,37.712 104.654,45.397 105.168,45.911 v1(108.7,45.911)
"VHOD 13B": DC3.A17 R87.2 | length 100.2
  Top Layer w0.254: v1(62.3,20.5) 63.46,21.66 64.188,21.66 67.612,25.084 73.01,25.084 78.126,30.2 82.084,30.2 84.284,32.4 v1(104.1,32.4) ; v1(106.1,57.2) 106.1,65.139 107.239,66.277 v1(108.7,66.277)
  Bottom Layer w0.254: DC3.A17@58.675,5.121 60,6.446 60,18.2 v1(62.3,20.5) ; v1(104.1,32.4) 105.4,33.7 105.4,56.5 v1(106.1,57.2)
"VHOD 14A": DC3.A16 R73.2 | length 76.2
  Top Layer w0.254: DC3.A16@56.175,5.121 57.4,6.346 57.4,21.1 58.868,22.568 63.812,22.568 67.236,25.992 72.634,25.992 77.842,31.2 81.8,31.2 84,33.4 101.268,33.4 105.226,37.358 105.226,38.783 105.75,39.307 v1(108.7,39.307)
"VHOD 14B": DC3.B17 R89.2 | length 91.8
  Top Layer w0.254: DC3.B17@58.675,7.621 60,8.946 60,20.1 62.014,22.114 64,22.114 67.424,25.538 72.822,25.538 78.03,30.746 81.988,30.746 84.188,32.946 102.472,32.946 103.326,33.8 v1(104.2,33.8)
  Bottom Layer w0.254: v1(104.2,33.8) 104.9,34.5 104.9,58.282 105.75,59.132 v1(108.7,59.132)
"VHOD 15A": DC3.B16 R75.2 | length 96.7
  Bottom Layer w0.254: DC3.B16@56.175,7.621 57.4,8.846 57.4,21.958 60.767,25.325 72.623,25.325 76.498,29.2 106.865,29.2 106.892,29.227 107.908,29.227 107.935,29.2 113.342,29.2 120.942,36.8 129.594,36.8 v1(132.051,39.257)
"VHOD 15B": DC3.C17 R91.2 | length 122.5
  Bottom Layer w0.3: DC3.C17@58.675,10.121 58.675,21.958 61.565,24.848 72.821,24.848 76.696,28.723 107.062,28.723 107.089,28.75 107.711,28.75 107.738,28.723 113.54,28.723 119.417,34.6 132.675,34.6 136,37.925 136,53.901 137.8,55.701 137.8,57.4 136.118,59.082 v1(132.051,59.082)
"VHOD 16A": DC3.C16 R77.2 | length 104.3
  Bottom Layer w0.254: DC3.C16@56.175,10.121 56.175,21.375 60.579,25.779 72.435,25.779 76.402,29.746 113.246,29.746 120.754,37.254 129.406,37.254 131.1,38.948 131.1,47.8 132.051,48.751 v1(132.051,49.407)
"VHOD 16B": DC3.A18 R93.2 | length 130.8
  Top Layer w0.254: v1(107.4,28) 112.153,32.753 114.295,32.753 120.754,39.212 120.754,72.796 121.573,73.615 121.573,74.001 122.472,74.9 130.071,74.9 132.051,72.92 v1(132.051,69.8)
  Bottom Layer w0.254: DC3.A18@61.175,5.121 61.221,5.121 62.302,6.202 62.302,8.139 62.251,8.19 62.251,9.603 62.302,9.654 62.302,18.36 67.859,23.917 73.207,23.917 76.39,27.1 105.028,27.1 105.928,28 v1(107.4,28)
"VHOD RC1": DC3.B10 R8.2 | length 122.8
  Top Layer w0.254: DC3.B10@41.175,7.621 42.302,8.748 42.302,23.198 v1(42.2,23.3) ; v1(41.2,79.4) 41.435,79.165 41.435,70.425 41.354,70.344 41.354,32.646 v1(44.3,29.7)
  Bottom Layer w0.254: v1(41.2,79.4) 31.049,89.551 31.049,109.649 33.801,112.401 v1(43.175,112.401) ; v1(42.2,23.3) 41.554,23.946 41.554,26.954 v1(44.3,29.7)
"VHOD RC2": DC3.C10 R9.2 | length 109.2
  Top Layer w0.254: v1(41.1,22.6) 41.175,22.525 DC3.C10@41.175,10.121 ; v1(43.1,29.8) 40.9,32 40.9,70.532 40.981,70.613 40.981,76.719 32.415,85.285 32.415,99.015 36.527,103.127 40.049,103.127 43.175,106.253 v1(43.175,107.418)
  Bottom Layer w0.254: v1(41.1,22.6) 41.1,27.8 v1(43.1,29.8)
"VHOD RC3": DC3.A11 R10.2 | length 117.1
  Top Layer w0.254: v1(65.8,73.25) 68.619,76.069 68.619,103.444 v1(68.675,103.5)
  Bottom Layer w0.254: DC3.A11@43.675,5.121 44.9,6.346 44.9,17.974 60.435,33.509 60.435,53.889 60.4,53.924 60.4,70.2 63,72.8 65.35,72.8 v1(65.8,73.25) ; v1(65.3,107.418) 68.032,107.418 68.675,106.775 v1(68.675,103.5)
"VHOD RC4": DC3.B11 R11.2 | length 118
  Top Layer w0.254: DC3.B11@43.675,7.621 44.9,8.846 44.9,19.5 v1(46,20.6) ; v1(63.9,73.7) 63.9,76 67.9,80 67.9,111.5 66.999,112.401 v1(65.276,112.401)
  Bottom Layer w0.254: v1(46,20.6) 59.981,34.581 59.981,53.701 59.935,53.747 59.935,59.366 59.708,59.593 59.708,70.99 62.418,73.7 v1(63.9,73.7)
"VHOD RC5": DC3.C11 R12.2 | length 106.1
  Top Layer w0.254: v1(43.175,95.075) 43.175,96.04 44.169,97.035 50.685,97.035 54,93.719 54,78.008 v1(59.254,72.754) ; DC3.C11@43.675,10.121 43.675,20.275 v1(45.7,22.3)
  Bottom Layer w0.254: v1(45.7,22.3) 45.828,22.3 58.354,34.826 58.354,55.712 59.481,56.839 59.481,59.178 59.254,59.405 v1(59.254,72.754)
"VHOD RC6": DC3.A12 R13.2 | length 100.6
  Top Layer w0.254: v1(43.175,90.082) 43.175,87.899 43.573,87.501 43.573,84.677 57.5,70.75 57.5,64.256 61.2,60.556 v1(61.2,58.8) ; v1(47.9,19.7) v1(47.9,25.4) ; v1(51.4,29) 58.054,35.654 58.054,47.435 62.619,52 v1(63.2,52)
  Bottom Layer w0.254: DC3.A12@46.175,5.121 47.302,6.248 47.302,19.102 v1(47.9,19.7) ; v1(47.9,25.4) 51.4,28.9 v1(51.4,29) ; v1(61.2,58.8) 63.2,56.8 v1(63.2,52)
"VHOD RC7": DC3.B12 R14.2 | length 114.8
  Top Layer w0.254: DC3.B12@46.175,7.621 47.302,8.748 47.302,16.527 56.067,25.292 62.683,25.292 73.6,36.209 73.6,83.395 v1(71.295,85.7) ; v1(65.325,90.082) 66.482,90.082 67.1,90.7 v1(67.1,96.575)
  Bottom Layer w0.254: v1(67.1,96.575) 68.777,94.898 68.777,88.218 v1(71.295,85.7)
"VHOD RC8": DC3.C12 R15.2 | length 104.6
  Top Layer w0.3: DC3.C12@46.175,10.121 46.175,16.075 55.869,25.769 62.486,25.769 73.077,36.36 73.077,77.123 v1(70.9,79.3)
  Bottom Layer w0.3: v1(65.4,95.1) 67.9,95.1 68.3,94.7 68.3,81.9 v1(70.9,79.3)
"VHOD RC9": DC3.B18 R55.2 | length 197.4
  Top Layer w0.254: DC3.B18@61.175,7.621 62.302,8.748 62.302,10.59 62.3,10.592 62.3,19.1 66.676,23.476 66.728,23.476 67.882,24.63 73.198,24.63 78.314,29.746 82.272,29.746 84.126,31.6 104.428,31.6 104.513,31.685 107.943,31.685 109.919,33.661 113.919,33.661 119.846,39.588 119.846,74.912 115.858,78.9 v1(75.8,78.9) ; v1(70.2,84.4) 69.129,85.471 69.129,99.243 69.073,99.299 69.073,101.373 69.5,101.8 69.5,105 68.5,106 68.5,111.336 69.566,112.401 v1(70.574,112.401)
  Bottom Layer w0.254: v1(70.2,84.4) 70.3,84.4 v1(75.8,78.9)
"VHOD RC10": DC3.C18 R56.2 | length 189.5
  Top Layer w0.254: v1(77.2,80.1) 115.3,80.1 120.3,75.1 120.3,39.4 114.107,33.207 110.107,33.207 v1(104.8,27.9)
  Bottom Layer w0.254: DC3.C18@61.175,10.121 61.175,17.875 67.671,24.371 73.019,24.371 76.548,27.9 v1(104.8,27.9) ; v1(70.574,107.418) 69.5,106.344 69.5,104.352 71.473,102.379 71.473,101.799 71.5,101.772 71.5,97.742 69.231,95.473 69.231,89.169 72.474,85.926 72.474,84.826 v1(77.2,80.1)
"VHOD RC11": DC3.A19 R57.2 | length 168.6
  Top Layer w0.254: DC3.A19@63.675,5.121 64.9,6.346 64.9,17.6 67.273,19.973 67.278,19.973 67.704,20.399 67.704,20.404 70.568,23.268 73.762,23.268 77.594,27.1 109.284,27.1 121.208,39.024 121.208,72.608 v1(122.3,73.7) ; v1(93.101,107.418) 94.282,107.418 97.023,104.677 97.023,85.177 98.4,83.8 v1(100.4,83.8)
  Bottom Layer w0.254: v1(100.4,83.8) 113.379,83.8 122.3,74.879 v1(122.3,73.7)
"VHOD RC12": DC3.B19 R58.2 | length 175.9
  Top Layer w0.254: v1(66.977,20.7) 69.999,23.722 73.574,23.722 78.69,28.838 82.648,28.838 84.041,30.231 105.115,30.231 105.384,30.5 v1(106.2,30.5) ; v1(96.5,76) 98.3,76 98.746,76.446 100.9,76.446 102.446,77.992 115.482,77.992 118.938,74.536 118.938,40.28 114.785,36.127 111.127,36.127 v1(107.6,32.6)
  Bottom Layer w0.254: DC3.B19@63.675,7.621 64.9,8.846 64.9,18.623 v1(66.977,20.7) ; v1(93.101,112.401) 96.499,112.401 97.5,111.4 97.5,99.8 99.227,98.073 99.227,90.899 98.9,90.572 98.9,82.8 97.5,81.4 97.5,81 96.5,80 v1(96.5,76) ; v1(106.2,30.5) 106.2,31.2 v1(107.6,32.6)
"VHOD RC13": DC3.C19 R59.2 | length 180.8
  Top Layer w0.254: v1(64.5,19.3) 69.376,24.176 73.386,24.176 78.502,29.292 82.46,29.292 84.126,30.958 v1(104.814,30.958) ; v1(80.6,76.9) 100.5,76.9 102.046,78.446 115.67,78.446 119.392,74.724 119.392,39.776 115.016,35.4 v1(112.9,35.4)
  Bottom Layer w0.254: DC3.C19@63.675,10.121 63.675,18.475 v1(64.5,19.3) ; v1(70.574,95.075) 70.574,96.174 72.1,97.7 79.646,97.7 80.6,96.746 v1(80.6,76.9) ; v1(104.814,30.958) 104.93,30.958 108.172,34.2 111.7,34.2 v1(112.9,35.4)
"VHOD RC14": DC3.A20 R60.2 | length 186.7
  Top Layer w0.254: v1(70.599,90.082) 70.599,88.373 77.372,81.6 114.672,81.6 114.699,81.627 122.773,81.627 v1(122.8,81.6) ; v1(109.227,24.227) 122.57,37.57 122.57,69.528 125.042,72 128.158,72 v1(128.8,72.642)
  Bottom Layer w0.254: DC3.A20@66.175,5.121 67.4,6.346 67.4,18.058 72.351,23.009 73.583,23.009 76.766,26.192 106.979,26.192 107.598,25.573 107.881,25.573 v1(109.227,24.227) ; v1(122.8,81.6) 124.1,81.6 128.8,76.9 v1(128.8,72.642)
"VHOD RC15": DC3.B20 R61.2 | length 159.5
  Top Layer w0.254: DC3.B20@66.175,7.621 67.5,8.946 67.5,19.553 68.158,20.211 68.158,20.216 70.756,22.814 73.95,22.814 77.782,26.646 105.382,26.646 106.628,25.4 109.442,25.4 122.116,38.074 122.116,71.652 123.737,73.273 124.123,73.273 124.65,73.8 v1(126.9,73.8) ; v1(93.126,90.082) 95.133,90.082 96.115,89.101 96.115,83.943 97.512,82.546 118.117,82.546 v1(118.571,83)
  Bottom Layer w0.254: v1(118.571,83) 126.9,74.671 v1(126.9,73.8)
"VHOD RC16": DC3.C20 R62.2 | length 155
  Top Layer w0.254: v1(93.101,95.075) 95.424,95.075 96.569,93.93 96.569,84.131 97.7,83 101.3,83 v1(103,84.7) ; v1(107.899,26.3) 109.7,26.3 121.662,38.262 121.662,71.841 v1(123.821,74)
  Bottom Layer w0.254: DC3.C20@66.175,10.121 66.175,17.475 72.163,23.463 73.395,23.463 76.578,26.646 107.553,26.646 v1(107.899,26.3) ; v1(103,84.7) 113.121,84.7 v1(123.821,74)
"VIHOD A": DC3.A21 DC3.B21 U2.3 U14.3 | length 309.2
  Top Layer w0.254: v1(37.86,135.076) v1(34.3,135.076) 33.776,135.076 33.1,134.4 33.1,122.8 34.127,121.773 47.714,121.773 47.922,121.981 73.012,121.981 74.093,120.9 v1(75.7,120.9) 75.7,139.1 77.819,141.219 95.181,141.219 96.3,140.1 96.3,136.3 97.524,135.076 U14.3@101.265,135.076 ; DC3.A21@68.675,5.121 DC3.B21@68.675,7.621 ; v1(111.6,23.7) 123.821,35.921 v1(123.821,38.079)
  Bottom Layer w0.254: DC3.B21@68.675,7.621 68.675,7.867 70.048,9.24 70.048,19.422 72.727,22.101 73.959,22.101 76.992,25.134 106.224,25.134 108.312,23.046 110.188,23.046 110.842,23.7 v1(111.6,23.7) ; v1(75.7,120.9) 81.519,115.081 81.519,105.126 81.527,105.118 81.527,104.515 81.466,104.455 81.466,98.812 81.627,98.651 81.627,98.049 81.519,97.941 81.519,81.339 88.392,74.466 91.889,74.466 92.05,74.627 116.131,74.627 116.7,74.058 116.7,62.079 116.673,62.053 116.673,60.899 116.7,60.872 116.7,56.228 115.7,55.228 115.7,46.2 v1(123.821,38.079)
"VIHOD B": DC3.A22 DC3.C21 U2.7 U14.7 | length 281.4
  Top Layer w0.254: v1(37.5,123.2) 34.3,126.4 v1(34.3,129.1) 35.276,130.076 U2.7@37.86,130.076 ; DC3.C21@68.675,10.121 69.802,8.994 69.802,7.154 69.8,7.152 69.8,6.496 DC3.A22@71.175,5.121 ; v1(80,123.2) 98.4,123.2 101.265,126.065 U14.7@101.265,130.076 ; v1(112,25.5) 123.024,36.524 123.024,57.324 123.982,58.282 v1(124.3,58.282)
  Bottom Layer w0.254: v1(37.5,123.2) 38.501,124.201 78.999,124.201 v1(80,123.2) 81.973,121.227 81.973,105.314 81.981,105.306 81.981,104.327 81.92,104.267 81.92,99 82.081,98.839 82.081,97.861 81.973,97.753 81.973,81.527 88.58,74.92 91.701,74.92 91.862,75.081 116.319,75.081 120.3,71.1 120.3,62.282 v1(124.3,58.282) ; DC3.C21@68.675,10.121 68.675,18.691 72.539,22.555 73.771,22.555 76.804,25.588 106.412,25.588 108.5,23.5 110,23.5 v1(112,25.5)
"VIHOD RC": DC3.B22 DC3.C22 U2.8 U14.8 | length 251.4
  Top Layer w0.254: DC3.B22@71.175,7.621 DC3.C22@71.175,10.121 71.175,19.281 78.086,26.192 105.194,26.192 108.413,22.973 111.973,22.973 112.926,23.926 112.926,23.989 113.618,24.681 113.681,24.681 125.5,36.5 v1(125.5,38.074) ; v1(77.2,125.9) 77.327,125.773 98.055,125.773 v1(98.782,126.5) ; v1(111.94,130.026) 114.274,130.026 116.1,128.2 v1(116.1,121)
  Bottom Layer w0.254: v1(48.535,130.026) v1(52.5,130.026) 53.074,130.026 55.4,127.7 67.5,127.7 68.719,126.481 76.619,126.481 v1(77.2,125.9) ; v1(98.782,126.5) 109,126.5 111.94,129.44 v1(111.94,130.026) ; v1(116.1,121) 123.3,121 126.7,117.6 126.7,83.846 129.7,80.846 129.7,72.024 128.2,70.524 128.2,58.8 126.346,56.946 126.346,45.075 126.431,44.99 126.431,39.005 v1(125.5,38.074)
pads on no net: DC3.A DC3.A30 DC3.B DC3.B30 DC3.C29 DC3.C30 DC4.A DC4.A3 DC4.A4 DC4.A5 DC4.B DC4.B3 DC4.B4 DC4.B5 DC4.C3 DC4.C4 DC4.C5 DC4.C30 R85.2 R218.1 U2.12 U2.13 U2.14 U3.8 U3.9 U3.10 U3.12 U3.13 U3.14 U14.12 U14.13 U14.14 U15.8 U15.9 U15.10 U15.12 U15.13 U15.14 U65.13 U65.14 U66.13 U66.14 U67.13 U67.14 U68.13 U68.14 U69.13 U69.14 U70.13 U70.14 U71.13 U71.14 U72.13 U72.14 U73.13 U73.14 U74.13 U74.14 U75.10 U75.11 U75.12 U75.13 U75.14 U76.13 U76.14
copper on no net: | length 4.2
  Top Layer w0.254: 99.25,52.293 99.25,51.05 99.5,50.8 100.508,50.8 101.15,50.158 101.15,49.457

## Polygon pours and split planes (outlines as drawn)
A on Top Layer "Top Layer-No Net" (solid, pour order 0): -0.095,-0.079 -0.095,26.921 cw(c-0.088,26.921) -0.088,26.928 5.905,26.928 5.905,156.921 cw(c5.912,156.921) 5.912,156.928 223.912,156.928 cw(c223.912,156.921) 223.919,156.921 223.919,26.928 229.912,26.928 cw(c229.912,26.921) 229.919,26.921 229.919,-0.079 cw(c229.912,-0.079) 229.912,-0.086 -0.088,-0.086 cw(c-0.088,-0.079)
A on Bottom Layer "Top Layer-No Net1" (solid, pour order 1): -0.095,-0.079 -0.095,26.921 cw(c-0.088,26.921) -0.088,26.928 5.905,26.928 5.905,156.921 cw(c5.912,156.921) 5.912,156.928 223.912,156.928 cw(c223.912,156.921) 223.919,156.921 223.919,26.928 229.912,26.928 cw(c229.912,26.921) 229.919,26.921 229.919,-0.079 cw(c229.912,-0.079) 229.912,-0.086 -0.088,-0.086 cw(c-0.088,-0.079)

## Keep-outs
Keep-Out Layer:
  lines w0.1: -0.088,-0.079 -0.088,26.921 5.912,26.921 5.912,156.921 223.912,156.921 223.912,26.921 229.912,26.921 229.912,-0.079 -0.088,-0.079

## Other copper
Top Layer:
  rectangle net A: 5.8,26.9 9.225,149.7
  rectangle net A: 5.8,149.7 223.912,156.921
  rectangle net A: 220.6,26.9 223.912,150.1
  rectangle net A: 220.6,-0.079 229.912,26.9
  rectangle net A: -0.088,-0.079 9.225,26.9
Bottom Layer:
  rectangle net A: 5.8,26.9 9.225,149.7
  rectangle net A: 5.8,149.7 223.912,156.921
  rectangle net A: 220.6,26.8 223.912,150.1
  rectangle net A: 220.6,-0.079 229.912,26.9
  rectangle net A: -0.088,-0.079 9.225,26.9
  region: 196.15,5.121
  region: 196.15,5.121

## Silkscreen, mask and mechanical layers (free items; w line width, h text height)
Top Overlay:
  lines w0.2: 33.7,128.55 33.7,129.75 34.9,129.75 34.9,128.55 33.7,128.55 ; 33.7,134.5 33.7,135.7 34.95,135.7 34.95,134.5 33.7,134.5 ; 51.9,129.476 51.9,130.676 53.15,130.676 53.15,129.476 51.9,129.476
  lines w0.254: 90.735,145.725 108.86,145.725 108.86,149.2 90.735,149.2 90.735,145.725
  text "A313-V.02" at 91.485,146.425 h2
  text "Bxod_A" at 32.4,135.4 h1 r50
  text "Bxod_PK" at 51.8,131.4 h1 r50
  text "Bxod_B" at 31.7,128.55 h1 r50
Mechanical 1:
  drawing of 202 lines, arcs and shapes, not listed

## Text inside footprints (layer, text, board x,y; h text height)
DC3: Top Overlay "32" at 95.342,12.631 h1; Top Overlay "C" at 7.475,9.574 h1; Top Overlay "B" at 7.475,7.074 h1; Top Overlay "A" at 7.475,4.574 h1; Top Overlay "1" at 18.525,12.625 h1; Bottom Overlay "32" at 97,12.631 h1; Bottom Overlay "1" at 19.1,12.375 h1 r359.86; Bottom Overlay "C" at 8.141,9.575 h1 r0.1; Bottom Overlay "B" at 8.141,7.074 h1 r0.05; Bottom Overlay "A" at 8.122,4.578 h1 r359.11
DC4: Top Overlay "1" at 133.483,12.446 h1; Top Overlay "A" at 122.45,4.574 h1; Top Overlay "B" at 122.45,7.074 h1; Top Overlay "C" at 122.45,9.574 h1; Top Overlay "32" at 210.317,12.446 h1; Bottom Overlay "A" at 123.097,4.578 h1 r359.11; Bottom Overlay "B" at 123.116,7.074 h1 r0.05; Bottom Overlay "C" at 123.116,9.575 h1 r0.1; Bottom Overlay "1" at 134.05,12.246 h1 r1.82; Bottom Overlay "32" at 211.975,12.471 h1